# Altium PCB Phaser.PcbDoc (part 13 of 16)
Units mm, origin at the board's own origin, x right, y up, seen from the top; angles counter-clockwise.
Board outline 161.99 x 100 mm, 6 copper layers (TopLayer, MidLayer1, MidLayer2, SignalLayer1, Internal Plane 1, BottomLayer), stack 1.528 mm thick; 1017 components, 665 nets, 3453 pads, 2223 vias.
Unrouted connection lines stored in the file: 1.
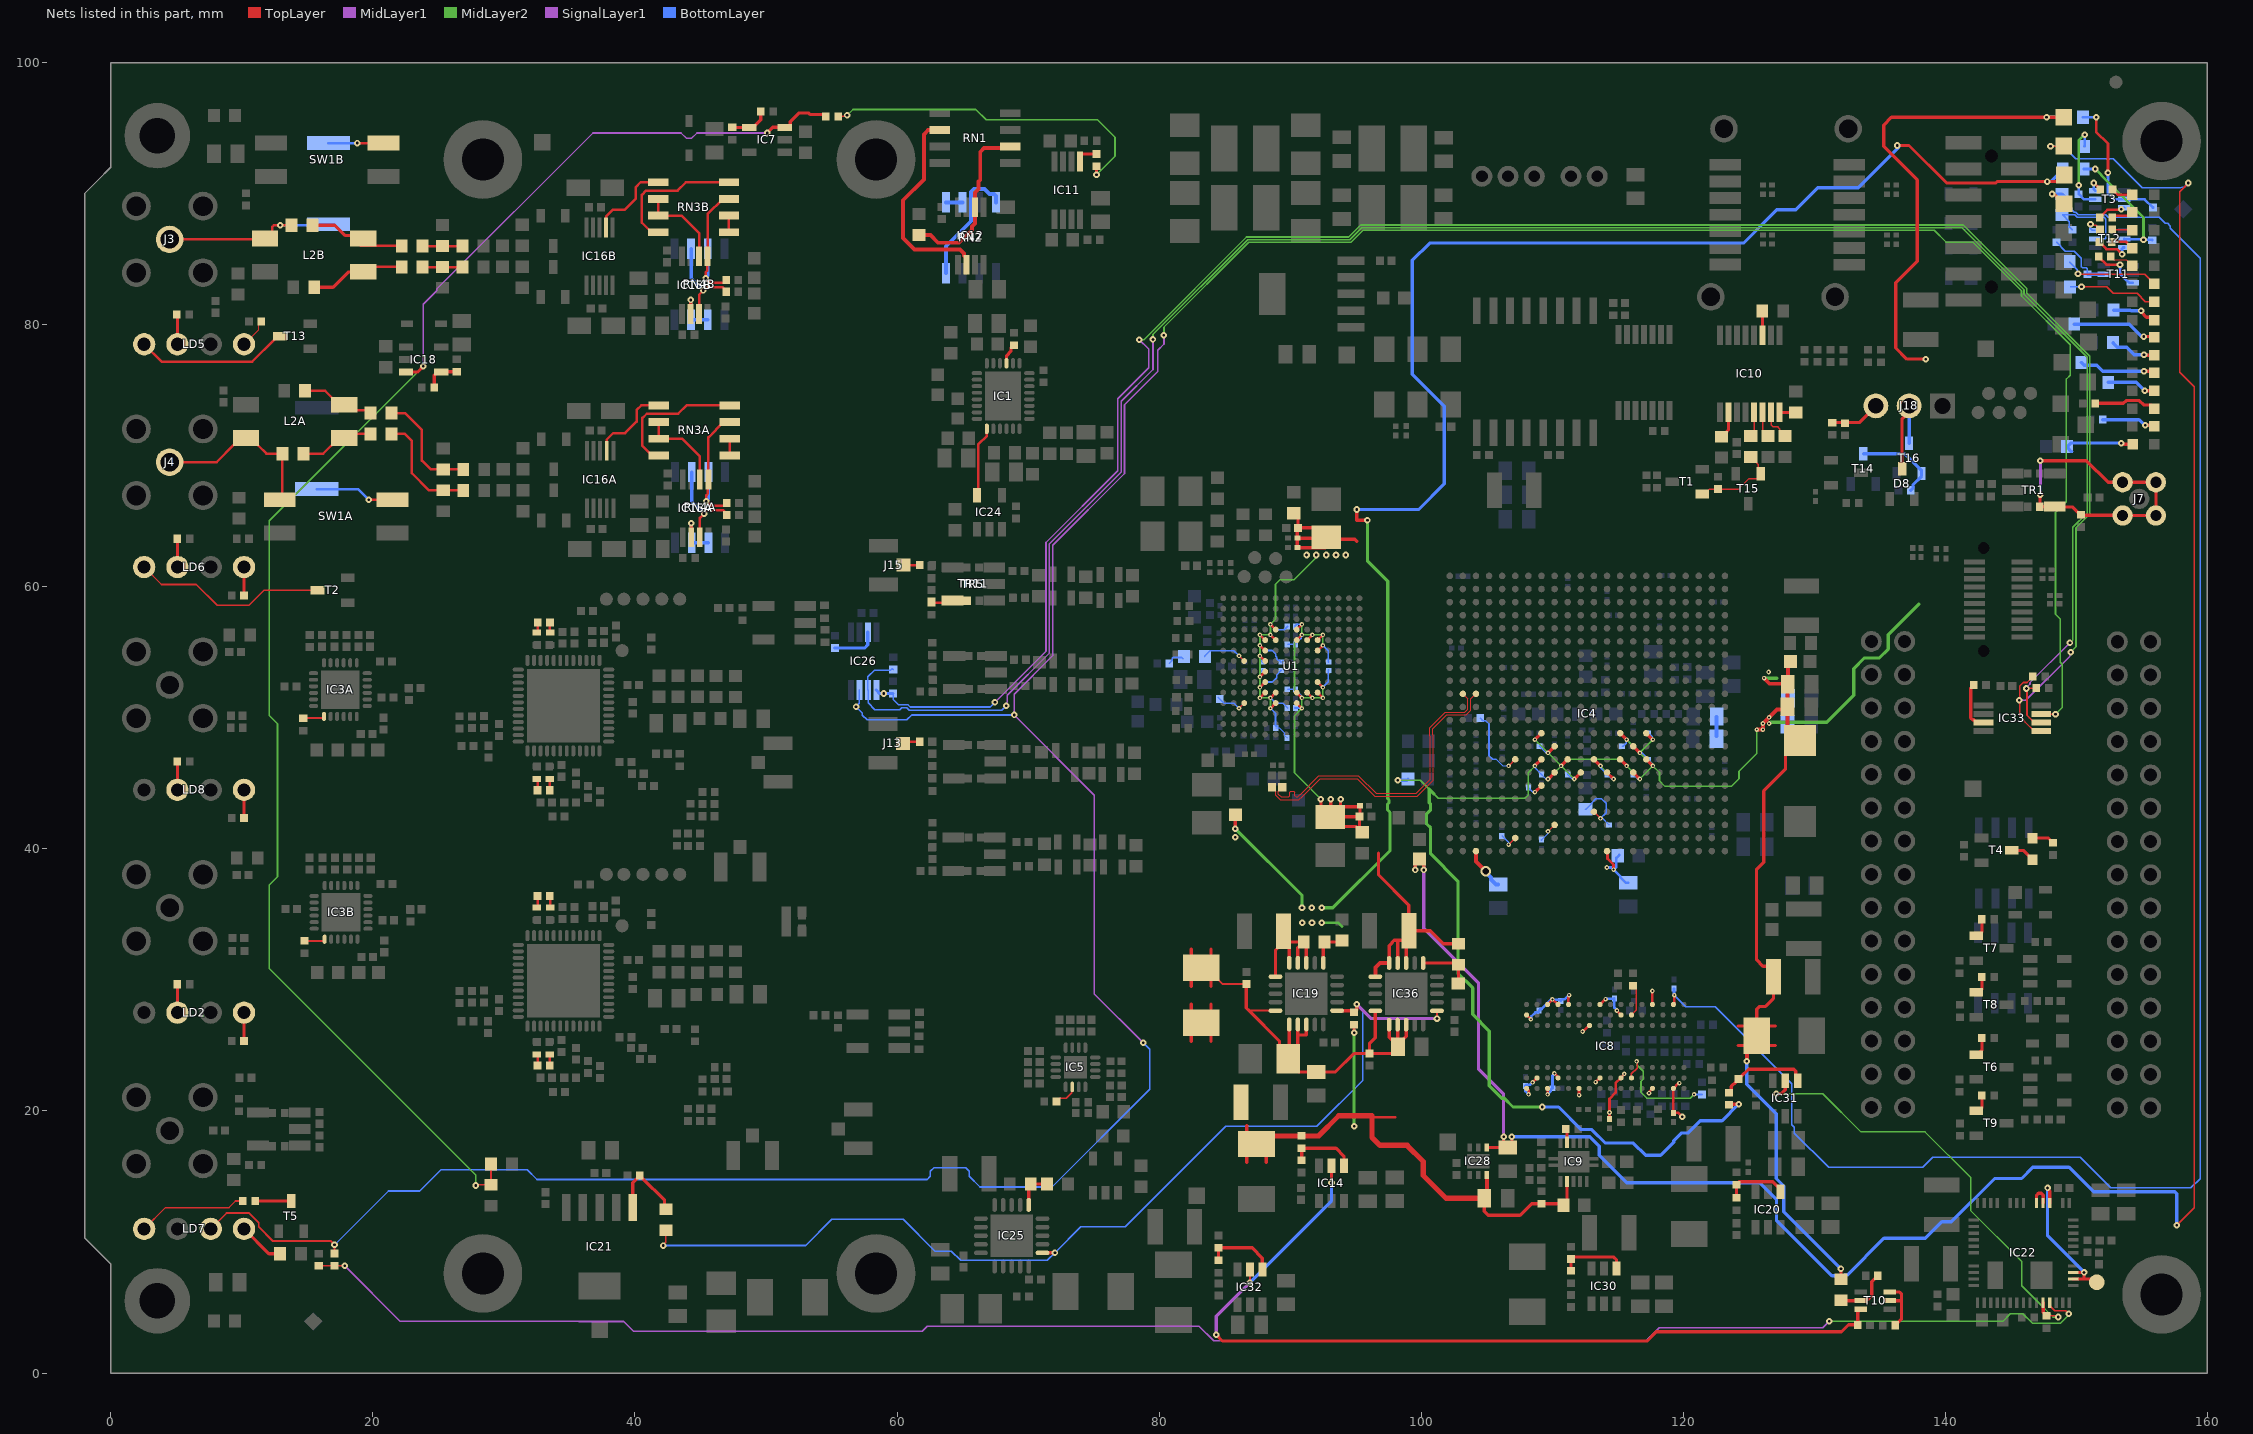
[diagram p15: the nets of this part, all layers, seen from the top]

## Via types
v1: diameter 0.5, hole 0.2, TopLayer to BottomLayer, tented both sides, 1374 vias
v2: diameter 0.35, hole 0.15, TopLayer to BottomLayer, tented both sides, 728 vias
v3: diameter 0.5, hole 0.2, TopLayer to BottomLayer, tented top, 96 vias
v4: diameter 0.6, hole 0.3, TopLayer to BottomLayer, 18 vias
v5: diameter 0.5, hole 0.2, TopLayer to BottomLayer, 5 vias
v6: diameter 0.35, hole 0.15, TopLayer to BottomLayer, 1 vias
v7: diameter 0.8, hole 0.5, TopLayer to BottomLayer, tented both sides, 1 vias

## Nets (pads, with @x,y where several pads share a name; then routed paths per layer and width w, separated by ;. In a path a pad name is that pad's centre, name@x,y a point inside that pad or via, vN(x,y) a via of type N, cw(c..) or ccw(c..) an arc to the next point about the centre after c; other vN are vias at no path point) (continued)
NetC389_1: C389.1 R85.1 R230.2 R254.2 TR5.4 TR11.4 | length 2.8
  TopLayer w0.19: R254.2@62.633,58.788 64.104,58.788 TR5.4@64.244,58.928 R85.1@65.338,58.928
NetD8_3: D8.3 J18.2 T16.3 | length 7.9
  TopLayer w0.25: D8.3@136.685,68.993 136.685,72.811 137.228,73.354 J18.2@137.228,73.8
  BottomLayer w0.25: T16.3@137.228,70.943 J18.2@137.228,73.8
NetIC1_9: IC1.9 IC24.5 | length 5.4
  TopLayer w0.19: IC24.5@66.1,66.975 66.214,67.089 66.214,70.88 66.85,71.516 IC1.9@66.85,72.05
NetIC1_25: IC1.25 R1.1 | length 1.6
  TopLayer w0.25: IC1.25@68.35,77.05 68.36,77.06 68.36,77.62 68.69,77.95 68.69,78.195 68.74,78.245 68.74,78.265 68.905,78.43 R1.1@68.925,78.43
NetIC3A_19: IC3A.19 R170.2 | length 1.7
  TopLayer w0.152: R170.2@14.735,49.981 16.273,49.981 16.275,49.983 IC3A.19@16.275,50.1
NetIC3B_19: IC3B.19 R147.2 | length 1.7
  TopLayer w0.152: R147.2@14.785,32.985 16.323,32.985 16.325,32.987 IC3B.19@16.325,33.104
NetIC4_F8: IC4.F8 R191.2 | length 5.8
  TopLayer w0.125: v2(106.675,46.325) IC4.F8@107.175,46.825
  BottomLayer w0.075: 105.727,46.819 106.221,46.325 v2(106.675,46.325)
  BottomLayer w0.125: R191.2@104.505,49.977 104.7,49.781 104.909,49.781 105.166,49.525 105.166,47.112 105.452,46.825 105.733,46.825
NetIC5_2: IC5.2 R165.2 | length 1.9
  TopLayer w0.125: R165.2@72.168,20.71 72.168,20.73 72.395,20.957 72.415,20.957 72.419,20.961 72.911,20.961 73.337,21.387 73.337,21.804 IC5.2@73.368,21.835
NetIC7_3: IC7.3 IC18.3 R60.1 R87.1 R130.1 | length 120.9
  TopLayer w0.125: v1(27.844,14.309) 27.9,14.366 R87.1@29.017,14.366 R130.1@29.017,15.96
  TopLayer w0.25: IC18.3@22.534,76.383 23.434,76.383 v1(23.859,76.808) ; v1(50.1,94.625) 50.525,95.05 IC7.3@51.425,95.05 51.7,95.05 51.85,95.2 51.85,95.475 52.525,96.15 53.242,96.15 53.355,96.037 54.407,96.037 54.559,95.885 R60.1@54.559,95.86
  MidLayer2 w0.125: v1(23.859,76.808) 12.09,65.04 12.09,50.179 12.729,49.54 12.729,37.88 12.09,37.242 12.09,30.867 27.844,15.114 v1(27.844,14.309)
  SignalLayer1 w0.125: v1(23.859,76.808) 23.859,81.56 24.888,82.588 24.888,82.713 36.8,94.625 43.521,94.625 43.933,94.213 44.317,94.213 44.729,94.625 v1(50.1,94.625)
NetIC7_4: IC7.4 R20.1 R23.2 | length 3.1
  TopLayer w0.25: R20.1@47.425,95.045 48.72,95.045 IC7.4@48.725,95.05 49.025,95.05 49.605,95.63 R23.2@49.605,96.275
NetIC8_L2: IC8.L2 R124.2 | length 9
  TopLayer w0.1: IC8.L2@116.041,22.52 116.041,22.841 116.465,23.265 v2@116.465,23.778
  MidLayer2 w0.125: v2@116.441,23.767 116.441,23.527 116.95,23.018 116.95,22.435 116.769,22.254 116.769,21.425 117.219,20.975 120.538,20.975 v2(120.825,21.262)
  BottomLayer w0.125: v2(120.825,21.262) 120.834,21.254 R124.2@121.42,21.254
  other v2: 116.43,23.778
NetIC8_L8: IC8.L8 R125.2 | length 2.4
  TopLayer w0.125: IC8.L8@116.041,27.32 116.392,27.671 116.392,29.544 R125.2@116.379,29.558
NetIC9_9: IC9.9 R127.1 | length 1
  TopLayer w0.25: R127.1@111.033,18.612 111.128,18.517 IC9.9@111.128,17.612
NetIC10_3: IC10.3 R185.1 | length 1.9
  TopLayer w0.25: R185.1@126.025,81.05 126.045,81.03 IC10.3@126.045,79.2
NetIC10_10: IC10.10 R187.2 | length 2.1
  TopLayer w0.25: R187.2@122.92,71.45 122.97,71.45 123.295,71.775 123.295,71.825 123.445,71.975 IC10.10@123.445,73.3
NetIC10_13: IC10.13 R56.2 | length 1.9
  TopLayer w0.115: R56.2@125.145,71.5 125.395,71.75 IC10.13@125.395,73.3
NetIC10_14: IC10.14 R186.1 | length 2
  TopLayer w0.115: IC10.14@126.045,73.3 126.045,71.9 126.07,71.875 126.07,71.825 126.395,71.5 R186.1@126.445,71.5
NetIC10_15: IC10.15 R188.1 | length 2.5
  TopLayer w0.115: IC10.15@126.695,73.3 126.704,73.291 126.704,72.346 126.85,72.2 127.199,72.2 127.345,72.054 127.345,71.9 127.37,71.875 127.37,71.825 127.695,71.5 R188.1@127.745,71.5
NetIC10_16: IC10.16 R189.1 | length 1.2
  TopLayer w0.25: IC10.16@127.345,73.3 R189.1@128.579,73.3
NetIC11_1: IC11.1 R90.1 | length 1.8
  TopLayer w0.25: IC11.1@73.97,92.45 73.97,93.02 R90.1@75.22,93.02
NetIC12_2: IC12.2 RN1.6 | length 16.4
  TopLayer w0.3: RN1.6@63.25,94.86 62.924,94.86 63.065,95.002 62.812,95.002 62.644,94.833 62.369,94.833 62.05,94.514 62.05,91.088 60.448,89.486 60.448,86.596 61.323,85.721 64.813,85.721 65.124,85.411 65.124,85.273 65.31,85.087 IC12.2@65.31,84.562
NetIC12_6: IC12.6 R7.1 RN1.2 | length 13.3
  TopLayer w0.3: R7.1@61.678,86.837 62.542,86.837 63.135,86.244 64.749,86.244 65.72,87.215 65.72,87.488 65.96,87.728 IC12.6@65.96,88.962 65.96,90.085 66.225,90.35 66.225,90.917 66.35,91.042 66.35,93.17 66.64,93.46 RN1.2@68.615,93.46
NetIC14_4: IC14.4 R133.1 R135.1 | length 5.1
  TopLayer w0.25: R135.1@90.875,16.245 R133.1@90.875,17.155 93.5,17.155 94.1,16.555 IC14.4@94.1,15.825
NetIC14_5: IC14.5 IC32.5 R154.1 T10.3 | length 68.5
  TopLayer w0.152: v1(86.925,6.9) IC32.5@86.925,7.9
  TopLayer w0.25: v1(84.35,2.925) 84.831,2.444 117.235,2.444 117.933,3.141 132.066,3.141 132.6,3.675 R154.1@133.305,3.675 133.305,4.63 T10.3@133.55,4.875 ; v1(93.15,14.525) IC14.5@93.15,15.825
  SignalLayer1 w0.25: v1(84.35,2.925) 84.35,4.325 v1(86.925,6.9)
  BottomLayer w0.25: v1(86.925,6.9) 93.15,13.125 v1(93.15,14.525)
NetIC15A_1: IC15A.1 R97A.1 RN3A.7 RN4A.7 | length 11.2
  TopLayer w0.19: R97A.1@47.005,66.38 46.808,66.183 45.792,66.183 v1(45.45,66.525) 45.45,66.97 45.575,67.095 45.575,68.055 45.525,68.105 IC15A.1@45.6,68.18 45.6,71.4 46.765,72.565 RN3A.7@47.225,72.565
  BottomLayer w0.25: v1(45.45,66.525) 45.61,66.685 RN4A.7@45.61,68.755
NetIC15A_2: IC15A.2 RN3A.2 RN3A.3 | length 6.7
  TopLayer w0.19: RN3A.2@41.825,72.565 RN3A.3@41.825,71.295 43.605,71.295 44.95,69.95 IC15A.2@44.95,68.18
NetIC15A_6: IC15A.6 RN4A.2 RN4A.3 | length 3.9
  TopLayer w0.25: IC15A.6@44.3,63.78 v1(44.3,64.855)
  BottomLayer w0.25: v1(44.3,64.855) 44.3,63.395 RN4A.3@44.34,63.355 RN4A.2@45.61,63.355
NetIC15A_7: IC15A.7 R58A.1 RN4A.6 | length 7.5
  TopLayer w0.19: IC15A.7@44.95,63.78 44.95,65.255 v1(45.275,65.58) 45.536,65.84 46.72,65.84 R58A.1@47.005,65.555
  BottomLayer w0.25: RN4A.6@44.34,68.755 44.34,66.515 v1(45.275,65.58)
NetIC15B_1: IC15B.1 R97B.1 RN3B.7 RN4B.7 | length 11.2
  TopLayer w0.19: R97B.1@46.955,83.405 46.758,83.208 45.742,83.208 v1(45.4,83.55) 45.4,83.995 45.525,84.12 45.525,85.08 45.475,85.13 IC15B.1@45.55,85.205 45.55,88.425 46.715,89.59 RN3B.7@47.175,89.59
  BottomLayer w0.25: v1(45.4,83.55) 45.56,83.71 RN4B.7@45.56,85.78
NetIC15B_2: IC15B.2 RN3B.2 RN3B.3 | length 6.7
  TopLayer w0.19: RN3B.2@41.775,89.59 RN3B.3@41.775,88.32 43.555,88.32 44.9,86.975 IC15B.2@44.9,85.205
NetIC15B_6: IC15B.6 RN4B.2 RN4B.3 | length 3.9
  TopLayer w0.25: IC15B.6@44.25,80.805 v1(44.25,81.88)
  BottomLayer w0.25: v1(44.25,81.88) 44.25,80.42 RN4B.3@44.29,80.38 RN4B.2@45.56,80.38
NetIC15B_7: IC15B.7 R58B.1 RN4B.6 | length 7.5
  TopLayer w0.19: IC15B.7@44.9,80.805 44.9,82.28 v1(45.225,82.605) 45.486,82.866 46.67,82.866 R58B.1@46.955,82.58
  BottomLayer w0.25: RN4B.6@44.29,85.78 44.29,83.54 v1(45.225,82.605)
NetIC16A_7: IC16A.7 RN3A.1 | length 6.4
  TopLayer w0.19: IC16A.7@37.85,70.38 37.85,71.23 38.345,71.725 39.25,71.725 40.125,72.6 40.125,73.475 40.485,73.835 RN3A.1@41.825,73.835
NetIC16B_7: IC16B.7 RN3B.1 | length 6.4
  TopLayer w0.19: IC16B.7@37.8,87.405 37.8,88.255 38.295,88.75 39.2,88.75 40.075,89.625 40.075,90.5 40.435,90.86 RN3B.1@41.775,90.86
NetIC18_4: IC18.4 R53.1 R80.2 | length 2.8
  TopLayer w0.25: R80.2@24.679,75.208 24.679,76.128 24.934,76.383 IC18.4@25.234,76.383 25.264,76.413 R53.1@26.409,76.413
NetIC19_11: IC19.11 IC25.11 IC36.11 R173.2 R240.2 | length 78.6
  TopLayer w0.125: v1(42.164,9.728) 42.164,9.793 42.36,9.989 R240.2@42.36,10.897 ; v1(101.2,27.049) IC36.11@101.2,27.639
  TopLayer w0.25: IC25.11@71.1,9.175 v1(72.05,9.175) ; IC19.11@93.579,27.647 94.748,27.647 R173.2@94.877,27.519 94.897,27.519 95.062,27.684 95.062,27.704 95.083,27.725 v1(95.083,28.142)
  SignalLayer1 w0.25: v1(95.083,28.142) 96.176,27.049 v1(101.2,27.049)
  BottomLayer w0.125: v1(42.164,9.728) 53.029,9.728 55.026,11.725 60.475,11.725 62.9,9.3 64.146,9.3 64.851,8.596 71.471,8.596 v1(72.05,9.175) 74.027,11.152 77.404,11.152 85.072,18.82 92.029,18.82 95.525,22.315 95.525,27.699 v1(95.083,28.142)
NetIC19_16: IC19.16 R180.1 R181.2 | length 3
  TopLayer w0.25: IC19.16@92.529,31.297 92.529,32.797 R180.1@92.629,32.897 R181.2@93.961,32.897
NetIC20_4: IC20.4 R166.1 R197.1 | length 4.9
  TopLayer w0.25: R197.1@124.05,13.365 R166.1@124.05,14.375 124.264,14.589 126.839,14.589 127.4,14.028 IC20.4@127.4,13.825
NetIC21_1: IC21.1 R132.2 R240.1 | length 6
  TopLayer w0.25: IC21.1@39.84,12.639 39.84,14.529 40.189,14.878 40.209,14.878 R132.2@40.374,15.043 ; R132.2@40.374,15.063 R132.2@40.374,15.043 ; R240.1@42.36,12.497 42.262,12.596 42.262,13.176 40.559,14.878 40.539,14.878 R132.2@40.374,15.043
NetIC22_4: IC22.4 IC22.43 IC22.44 TP2.1 | length 12.1
  TopLayer w0.254: v1(147.789,14.121) 147.789,14.055 147.95,13.894 IC22.4@147.95,12.975 ; IC22.43@149.75,7.175 150.525,7.175 ; IC22.44@149.75,7.675 v1(150.575,7.675) 150.575,7.225 150.525,7.175 ; TP2.1@151.55,6.925 151.3,7.175 150.525,7.175
  BottomLayer w0.254: v1(147.789,14.121) 147.789,10.461 v1(150.575,7.675)
NetIC22_5: IC22.5 IC22.6 | length 1.8
  TopLayer w0.254: IC22.6@146.95,12.975 146.95,13.576 147.099,13.725 147.301,13.725 147.45,13.576 IC22.5@147.45,12.975
NetIC22_37: IC22.37 IC31.5 R172.1 | length 34.6
  TopLayer w0.125: R172.1@147.7,4.37 148.505,4.37 v1(148.6,4.275)
  TopLayer w0.25: v1(127.1,21.32) 127.47,21.32 127.775,21.625 IC31.5@127.775,22.3
  TopLayer w0.254: IC22.37@147.45,5.375 147.45,4.62 R172.1@147.7,4.37
  MidLayer2 w0.125: v1(127.1,21.32) 130.627,21.32 133.549,18.398 138.444,18.398 141.928,14.914 ; 141.916,14.903 141.916,12.407 145.816,8.506 145.816,6.667 147.011,5.472 148.209,4.275 v1(148.6,4.275)
NetIC22_38: IC22.38 R169.2 R174.2 | length 139.7
  TopLayer w0.125: R169.2@15.875,8.175 15.88,8.18 R174.2@17.075,8.18 v1(17.85,8.18) ; IC22.38@147.95,5.375 147.95,5.136 148.335,4.751 149.174,4.751 v1(149.4,4.525)
  MidLayer2 w0.125: v1(131.14,3.962) 144.383,3.962 144.933,4.513 144.938,4.513 144.95,4.525 145.905,4.525 146.618,3.812 148.792,3.812 149.4,4.421 v1(149.4,4.525)
  SignalLayer1 w0.125: v1(17.85,8.18) 22.067,3.963 35.692,3.963 35.717,3.938 39.142,3.938 39.892,3.187 61.917,3.187 62.303,3.573 83.047,3.573 84.158,2.462 117.163,2.462 118.15,3.45 130.628,3.45 v1(131.14,3.962)
NetIC25_16: IC25.16 R167.1 R168.2 | length 2.9
  TopLayer w0.25: IC25.16@70.05,12.825 70.05,14.275 R167.1@70.2,14.425 R168.2@71.45,14.425
NetIC26_1: IC26.1 IC33.1 R171.1 R179.2 | length 157.9
  TopLayer w0.125: R179.2@146.672,53.162 146.672,53.142 146.226,52.696 145.935,52.696 145.664,52.425 145.664,51.325 145.664,50.087 146.488,49.263 146.502,49.263 146.819,48.946 IC33.1@147.269,48.946
  MidLayer2 w0.125: v1(78.485,78.855) 78.84,78.855 86.667,86.682 94.469,86.682 95.384,87.596 134.627,87.596 134.629,87.598 141.35,87.598 146.199,82.749 146.199,82.409 151.019,77.589 151.019,65.548 149.962,64.491 149.962,55.415 v1(149.546,54.999)
  SignalLayer1 w0.125: v1(67.473,51.175) 71.365,55.067 71.365,63.38 76.841,68.856 76.841,74.351 79.2,76.711 79.2,78.14 v1(78.485,78.855) ; v1(145.626,51.325) 146.121,51.325 149.474,54.678 149.474,54.927 v1(149.546,54.999)
  BottomLayer w0.127: R171.1@59.698,51.849 59.698,51.401 60.118,50.982 60.833,50.982 60.996,50.819 67.117,50.819 v1(67.473,51.175)
  BottomLayer w0.25: IC26.1@58.423,52.119 58.693,51.849 R171.1@59.698,51.849
  other v1: 58.987,51.851
NetIC26_2: IC26.2 IC33.2 R162.1 R175.2 | length 158.1
  TopLayer w0.125: v1(146.18,52.233) 146.193,52.246 R175.2@146.672,52.246 ; v1@146.226,52.246 146.226,50.189 146.399,50.016 146.399,50.002 146.488,49.913 146.502,49.913 146.809,49.606 IC33.2@146.863,49.606 ; R175.2@146.672,52.261 R175.2@146.934,52.261
  MidLayer2 w0.125: v1(79.527,78.867) 79.527,79.258 86.75,86.481 94.552,86.481 95.467,87.395 134.71,87.395 134.712,87.397 141.266,87.397 145.998,82.666 145.998,82.325 150.818,77.505 150.818,65.631 149.715,64.528 149.715,55.935 149.511,55.731 v1(149.499,55.731)
  SignalLayer1 w0.125: v1(68.346,50.918) 68.418,50.989 68.418,51.726 71.629,54.937 71.629,63.271 77.104,68.747 77.104,74.152 79.527,76.575 v1(79.527,78.867) ; v1(146.18,52.233) 146.18,52.308 146.452,52.58 146.452,52.684 v1(149.499,55.731)
  BottomLayer w0.127: R162.1@59.715,53.683 59.677,53.721 59.601,53.721 59.504,53.624 58.278,53.624 57.773,53.119 IC26.2@57.773,52.119 57.792,52.101 57.792,51.14 58.31,50.622 60.216,50.622 60.36,50.766 60.744,50.766 60.941,50.569 67.997,50.569 v1(68.346,50.918)
NetIC26_3: IC26.3 IC33.3 LD7.3 R174.1 | length 268.7
  TopLayer w0.127: LD7.3@7.63,11 8.83,12.2 ; R174.1@17.075,9.12 v1(17.075,9.775) ; IC33.3@147.3,50.29 147.323,50.267 v1(148.398,50.267)
  TopLayer w0.152: 8.83,12.2 10.562,12.2 11.296,11.466 11.296,11.154 12.375,10.075 16.775,10.075 v1(17.075,9.775)
  MidLayer2 w0.125: v1(80.366,79.178) 80.366,79.811 86.834,86.279 94.636,86.279 95.55,87.194 135.081,87.194 135.083,87.196 139.142,87.196 140.042,86.296 142.083,86.296 145.797,82.582 145.797,82.186 149.511,78.472 149.511,76.132 149.23,75.851 149.23,66.493 148.398,65.661 148.398,57.892 148.76,57.53 148.76,54.24 148.921,54.079 148.921,50.79 v1(148.398,50.267)
  SignalLayer1 w0.125: 71.882,54.746 71.882,63.166 77.358,68.642 77.358,73.895 79.888,76.426 79.888,78.043 80.366,78.521 v1(80.366,79.178)
  SignalLayer1 w0.127: 71.882,54.746 68.939,51.803 v1(68.939,50.213) 75.061,44.092 75.061,28.927 v1(78.791,25.197)
  BottomLayer w0.127: v1(17.075,9.775) 21.193,13.893 23.581,13.893 25.196,15.508 31.786,15.508 32.521,14.773 62.294,14.773 62.544,15.022 62.544,15.392 62.815,15.663 65.235,15.663 65.506,15.392 65.506,15.022 66.328,14.2 71.826,14.2 79.275,21.65 79.275,24.713 v1(78.791,25.197) ; IC26.3@57.123,52.119 57.123,51.1 v1(56.871,50.848) 57.356,50.362 57.356,50.202 57.72,49.839 60.744,49.839 61.119,50.213 v1(68.939,50.213)
NetIC26_7: IC26.7 R178.2 | length 3.6
  BottomLayer w0.25: R178.2@55.253,55.324 57.53,55.324 57.773,55.567 IC26.7@57.773,56.519
NetIC30_4: IC30.4 R198.1 R199.1 | length 5.2
  TopLayer w0.25: R199.1@111.425,7.795 R198.1@111.425,8.705 111.57,8.85 114.7,8.85 114.9,8.65 IC30.4@114.9,7.975
NetIC31_4: IC31.4 R131.2 R241.1 | length 7
  TopLayer w0.25: R131.2@123.396,21.488 R131.2@123.486,21.398 123.647,21.559 123.647,21.867 124.02,22.24 124.04,22.24 124.205,22.405 R241.1@124.205,22.425 124.205,22.445 124.37,22.61 124.39,22.61 124.97,23.19 128.422,23.19 128.568,23.043 128.568,22.457 IC31.4@128.725,22.3
NetIC32_4: IC32.4 R200.1 R201.1 | length 5.5
  TopLayer w0.25: R200.1@84.525,8.595 R201.1@84.525,9.555 87.095,9.555 87.875,8.775 IC32.4@87.875,7.9
NetIC33_7: IC33.7 R176.2 | length 3.7
  TopLayer w0.25: R176.2@142.155,52.5 142.155,52.48 141.936,52.262 141.936,49.976 142.062,49.851 142.164,49.851 142.375,49.64 IC33.7@142.9,49.64
NetIC36_16: IC36.16 R255.1 R256.2 | length 4.2
  TopLayer w0.25: IC36.16@100.15,31.289 102.719,31.289 R255.1@102.85,31.158 102.85,29.757 R256.2@102.825,29.732
NetJ3_1: J3.1 L2B.1 R8B.1 R83B.2 | length 13.9
  TopLayer w0.19: J3.1@4.307,86.5 J3.1@4.5,86.5 11.7,86.5 L2B.1@11.775,86.575 11.839,86.575 12.344,87.08 12.344,87.469 12.455,87.58 v1(12.925,87.58) R8B.1@13.8,87.58
  BottomLayer w0.19: v1(12.925,87.58) 16.539,87.58 R83B.2@16.612,87.653
NetJ4_1: J4.1 L2A.2 R98A.1 SW1A.1 | length 13.7
  TopLayer w0.19: J4.1@4.307,69.5 J4.1@4.5,69.5 8.082,69.5 9.421,70.839 9.421,70.85 9.926,71.355 L2A.2@10.326,71.355 10.726,71.355 11.231,70.85 11.231,70.795 11.876,70.15 R98A.1@13.104,70.15 13.104,66.836 SW1A.1@12.898,66.63
NetJ7_2: J7.2 R27.2 R45.1 TR1.6 | length 25.7
  TopLayer w0.25: R45.1@147.193,66.091 147.437,66.091 148.323,66.091 149.682,66.091 150.395,65.378 150.479,65.462 153.486,65.462 J7.2@153.518,65.43 J7.2@156.058,65.43 J7.2@156.058,67.97 J7.2@153.518,67.97 153.515,67.968 152.412,67.968 150.759,69.621 v1(147.244,69.621) ; R45.1@147.207,66.105 147.437,66.105 148.323,66.105 TR1.6@148.328,66.11 ; v1(147.218,67.031) 147.218,66.319 R45.1@147.244,66.294
  MidLayer1 w0.25: v1(147.218,67.031) 147.244,67.056 v1(147.244,69.621)
NetJ13_1: J13.1 R246.1 | length 1.4
  TopLayer w0.19: J13.1@60.329,48.172 R246.1@61.734,48.172
NetJ15_1: J15.1 R247.1 | length 1.2
  TopLayer w0.19: J15.1@60.5,61.646 R247.1@61.744,61.646
NetJ18_3: J18.3 R276.2 R277.2 | length 3.9
  TopLayer w0.25: R277.2@131.359,72.524 133.411,72.524 J18.3@134.688,73.8
NetL2A_3: L2A.3 R25A.1 R98A.2 | length 5.6
  TopLayer w0.19: R98A.2@14.704,70.15 16.221,70.15 17.338,71.267 L2A.3@17.738,71.267 ; L2A.3@17.826,71.355 18.125,71.653 R25A.1@19.83,71.653
NetL2A_4: L2A.4 R8A.2 R9A.1 | length 5.7
  TopLayer w0.19: R8A.2@14.836,74.95 16.352,74.95 17.407,73.895 L2A.4@17.826,73.895 18.245,73.475 19.609,73.475 R9A.1@19.83,73.253
NetL2B_3: L2B.3 R25B.1 R98B.2 | length 6.6
  TopLayer w0.19: L2B.3@19.275,83.885 19.795,84.405 R25B.1@22.2,84.405
  TopLayer w0.25: R98B.2@15.525,82.85 16.965,82.85 18.125,84.01 L2B.3@18.525,84.01
NetL2B_4: L2B.4 R8B.2 R9B.1 | length 8.1
  TopLayer w0.19: L2B.4@19.275,86.575 19.07,86.37 19.07,86.005 R9B.1@22.2,86.005
  TopLayer w0.25: R8B.2@15.4,87.58 17.095,87.58 17.87,86.805 19.045,86.805 L2B.4@19.275,86.575
NetL29A_2: L29A.2 R38A.2 | length 0.8
  TopLayer w0.19: L29A.2@33.496,24.315 33.496,23.487 R38A.2@33.508,23.474
NetL29B_2: L29B.2 R38B.2 | length 0.9
  TopLayer w0.19: L29B.2@33.506,45.327 33.506,44.468 R38B.2@33.508,44.466
NetL31A_2: L31A.2 R38A.1 | length 0.8
  TopLayer w0.19: R38A.1@32.568,23.474 32.571,23.476 L31A.2@32.571,24.315
NetL31B_2: L31B.2 R38B.1 | length 0.9
  TopLayer w0.19: R38B.1@32.568,44.466 32.581,44.479 L31B.2@32.581,45.327
NetL33A_2: L33A.2 R41A.2 | length 0.9
  TopLayer w0.19: R41A.2@33.508,36.404 33.525,36.387 L33A.2@33.525,35.529
NetL33B_2: L33B.2 R41B.2 | length 0.7
  TopLayer w0.19: L33B.2@33.516,56.52 R41B.2@33.516,57.255
NetL38A_2: L38A.2 R41A.1 | length 0.9
  TopLayer w0.19: R41A.1@32.568,36.404 32.6,36.372 L38A.2@32.6,35.529
NetL38B_2: L38B.2 R41B.1 | length 0.7
  TopLayer w0.19: R41B.1@32.576,57.255 32.591,57.24 L38B.2@32.591,56.52
NetLD1_1: LD1.1 R202.1 | length 1.7
  TopLayer w0.2: R202.1@152.718,88.163 152.853,88.299 154.011,88.299 LD1.1@154.267,88.556
NetLD2_2: LD2.2 R153.2 | length 2.2
  TopLayer w0.25: LD2.2@5.09,27.5 R153.2@5.09,29.662
NetLD2_4: LD2.4 R26.2 | length 2.2
  TopLayer w0.25: R26.2@10.17,25.338 LD2.4@10.17,27.5
NetLD3_1: LD3.1 T4.3 | length 1.9
  TopLayer w0.25: T4.3@145.05,39.875 145.942,39.875 LD3.1@146.642,39.175
NetLD3_2: LD3.2 R92.1 | length 1.7
  TopLayer w0.25: LD3.2@146.642,40.825 147.845,40.825 R92.1@148.2,40.47
NetLD4_2: LD4.2 R213.1 | length 3.5
  TopLayer w0.25: v1(154.924,81.047) 154.924,80.98 155.332,80.572 155.686,80.572 LD4.2@155.917,80.34
  BottomLayer w0.25: R213.1@152.819,81.102 154.119,81.102 154.174,81.047 v1(154.924,81.047)
NetLD5_1: LD5.1 T13.3 | length 11.7
  TopLayer w0.19: LD5.1@2.55,78.5 3.875,77.175 10.801,77.175 12.495,78.869 12.495,78.872 12.725,79.102 T13.3@12.925,79.102
NetLD5_2: LD5.2 R64.2 | length 2.2
  TopLayer w0.25: LD5.2@5.09,78.5 R64.2@5.09,80.662
NetLD5_4: LD5.4 R28.2 | length 2.3
  TopLayer w0.095: LD5.4@10.17,78.5 11.278,79.607 11.278,80.024 R28.2@11.495,80.241
NetLD6_1: LD6.1 T2.3 | length 14.9
  TopLayer w0.127: LD6.1@2.55,61.5 3.877,60.173 6.534,60.173 8.13,58.577 10.555,58.577 11.721,59.743 T2.3@15.779,59.743
NetLD6_2: LD6.2 R260.2 | length 2.2
  TopLayer w0.25: LD6.2@5.09,61.5 R260.2@5.09,63.662
NetLD6_4: LD6.4 R30.2 | length 2.2
  TopLayer w0.25: R30.2@10.17,59.338 LD6.4@10.17,61.5
NetLD7_1: LD7.1 R44.2 | length 8.4
  TopLayer w0.125: LD7.1@2.55,11 4.175,12.625 9.025,12.625 9.525,13.125 R44.2@10.08,13.125
NetLD7_4: LD7.4 R143.1 | length 3.5
  TopLayer w0.25: LD7.4@10.17,11 12.07,9.1 R143.1@12.925,9.1
NetLD8_2: LD8.2 R152.2 | length 2.2
  TopLayer w0.25: LD8.2@5.09,44.5 R152.2@5.09,46.662
NetLD8_4: LD8.4 R234.2 | length 2.2
  TopLayer w0.25: R234.2@10.17,42.338 LD8.4@10.17,44.5
NetLD9_1: LD9.1 R204.1 | length 1.6
  TopLayer w0.127: R204.1@152.73,87.249 154.214,87.249 LD9.1@154.267,87.196
NetLD10_1: LD10.1 R33.1 | length 1.7
  TopLayer w0.19: R33.1@152.743,90.322 152.743,90.302 153.129,89.916 LD10.1@154.267,89.916
NetLD11_2: LD11.2 R218.1 | length 4.8
  TopLayer w0.25: R218.1@151.422,73.99 153.562,73.99 153.779,74.207 154.796,74.207 155.134,73.868 155.642,73.868 LD11.2@155.917,73.593
NetLD12_1: LD12.1 R207.1 | length 1.8
  TopLayer w0.2: R207.1@152.692,86.309 153.793,86.309 LD12.1@154.267,85.835
NetLD13_1: LD13.1 R221.1 | length 1.4
  TopLayer w0.095: R221.1@152.626,85.195 152.86,84.962 153.781,84.962 LD13.1@153.906,84.836
NetLD14_2: LD14.2 R211.1 | length 7.3
  TopLayer w0.1: v1(150.115,83.875) 150.155,83.836 155.197,83.836 LD14.2@155.917,83.115
  BottomLayer w0.1: R211.1@149.479,84.811 149.479,84.761 150.039,84.201 150.039,83.952 v1(150.115,83.875)
NetLD15_2: LD15.2 R212.1 | length 6.9
  TopLayer w0.1: v1(150.381,82.875) 152.316,82.875 152.794,82.398 154.621,82.398 155.264,81.755 LD15.2@155.917,81.755
  BottomLayer w0.1: R212.1@149.504,82.88 149.51,82.875 v1(150.381,82.875)
NetLD16_2: LD16.2 R214.1 | length 6.5
  TopLayer w0.254: v1(155.126,79.088) 155.848,79.088 LD16.2@155.917,79.019
  BottomLayer w0.254: R214.1@149.822,80.035 154.012,80.035 154.959,79.088 v1(155.126,79.088)
NetLD17_2: LD17.2 R215.1 | length 3.6
  TopLayer w0.254: v1(155.15,77.709) 155.185,77.674 LD17.2@155.917,77.674
  BottomLayer w0.254: R215.1@152.794,78.638 152.794,78.588 153.117,78.265 153.839,78.265 154.396,77.709 v1(155.15,77.709)
NetLD18_2: LD18.2 R216.1 | length 5.9
  TopLayer w0.254: v1(155.15,76.441) 155.79,76.441 LD18.2@155.917,76.314
  BottomLayer w0.254: R216.1@150.368,77.114 150.582,76.9 151.541,76.9 152.001,76.441 v1(155.15,76.441)
NetLD19_2: LD19.2 R217.1 | length 3.8
  TopLayer w0.254: v1(155.197,74.964) 155.207,74.953 LD19.2@155.917,74.953
  BottomLayer w0.254: R217.1@152.425,75.59 154.57,75.59 v1(155.197,74.964)
NetLD20_2: LD20.2 R219.1 | length 4.1
  TopLayer w0.25: v1(155.235,72.321) 155.829,72.321 LD20.2@155.917,72.233
  BottomLayer w0.25: R219.1@152.006,72.746 154.776,72.746 155.2,72.321 v1(155.235,72.321)
NetLD21_1: LD21.1 R220.1 | length 5.7
  TopLayer w0.25: v1(153.412,70.961) 153.501,70.873 LD21.1@154.291,70.873
  BottomLayer w0.25: R220.1@149.651,70.313 149.601,70.313 149.276,70.638 R220.1@149.276,70.688 149.549,70.961 v1(153.412,70.961)
NetR9A_2: R9A.2 R10A.1 R51A.2 | length 8.6
  TopLayer w0.19: R9A.2@21.43,73.253 22.469,73.253 23.75,71.972 23.75,69.63 24.425,68.955 R51A.2@25.375,68.955 R10A.1@26.9,68.955
NetR9B_2: R9B.2 R10B.1 R51B.2 | length 3
  TopLayer w0.19: R9B.2@23.8,85.98 25.325,85.98 R10B.1@26.85,85.98
NetR25A_2: R25A.2 R74A.1 R137A.2 | length 8.7
  TopLayer w0.19: R25A.2@21.43,71.653 22.441,71.653 22.975,71.12 22.975,68.657 24.277,67.355 R137A.2@25.375,67.355 R74A.1@26.9,67.355
NetR25B_2: R25B.2 R74B.1 R137B.2 | length 3
  TopLayer w0.19: R25B.2@23.8,84.38 25.325,84.38 R74B.1@26.85,84.38
NetR33_2: R33.2 T3.6 | length 1.3
  TopLayer w0.19: v1(151.32,90.805) 151.34,90.805 151.803,90.342 R33.2@151.803,90.322
  BottomLayer w0.19: v1(151.32,90.805) 151.32,90.315 151.425,90.21 T3.6@151.427,90.21
NetR34_1: R34.1 U1.H12 | length 3.5
  TopLayer w0.125: v2(86.093,54.725) U1.H12@86.493,54.325
  BottomLayer w0.125: R34.1@83.492,54.676 83.492,54.726 83.879,55.113 83.892,55.113 83.904,55.125 85.693,55.125 v2(86.093,54.725)
NetR34_2: R34.2 R35.1 | length 1.4
  BottomLayer w0.127: R35.1@80.785,54.153 81.011,54.379 81.011,54.552 81.06,54.6 81.721,54.6 R34.2@81.821,54.5
NetR44_1: R44.1 T5.3 | length 2.8
  TopLayer w0.25: R44.1@11.02,13.125 T5.3@13.775,13.125
NetR56_1: R56.1 R190.1 T1.1 T15.1 | length 6.8
  TopLayer w0.115: T1.1@121.445,67.075 121.645,67.075 121.845,67.275 121.845,67.309 121.991,67.455 R190.1@122.645,67.455 124.215,67.455 125.007,68.248 125.695,68.248 125.895,68.448 T15.1@125.895,68.625 125.717,68.803 125.717,69.328 125.52,69.525 125.52,69.575 125.195,69.9 R56.1@125.145,69.9
NetR60_2: R60.2 R90.2 | length 26.3
  TopLayer w0.125: R60.2@55.512,95.885 56.007,95.885 56.083,95.961 v1(56.185,95.961)
  TopLayer w0.25: v1(75.22,91.425) R90.2@75.22,92.08
  MidLayer2 w0.125: v1(56.185,95.961) 56.642,96.418 66.012,96.418 66.805,95.625 75.294,95.625 76.632,94.288 76.632,92.837 v1(75.22,91.425)
NetR63_2: R63.2 U1.D12 | length 2.5
  TopLayer w0.125: v2(86.093,50.725) U1.D12@86.493,51.125
  BottomLayer w0.125: R63.2@84.516,51.55 84.954,51.112 85.705,51.112 v2(86.093,50.725)
NetR70_1: R70.1 T6.1 | length 1.5
  TopLayer w0.25: T6.1@142.35,24.4 142.55,24.4 142.78,24.63 R70.1@142.78,25.575
NetR82_1: R82.1 T7.1 | length 1.5
  TopLayer w0.25: T7.1@142.35,33.45 142.55,33.45 142.78,33.68 R82.1@142.78,34.625
NetR83A_1: R83A.1 SW1A.4 | length 6.1
  TopLayer w0.19: v1(19.703,66.63) SW1A.4@21.498,66.63
  BottomLayer w0.19: R83A.1@15.725,67.455 18.878,67.455 v1(19.703,66.63)
NetR83B_1: R83B.1 SW1B.4 | length 4.2
  TopLayer w0.19: v1(18.821,93.853) 18.825,93.849 SW1B.4@20.825,93.849
  BottomLayer w0.19: R83B.1@16.612,93.853 v1(18.821,93.853)
NetR139_1: R139.1 T10.5 T10.6 | length 4.4
  TopLayer w0.25: T10.5@135.75,5.525 136.65,5.525 ; T10.6@135.75,6.175 136.5,6.175 136.65,6.025 136.65,5.525 ; R139.1@136.17,3.65 136.65,4.13 136.65,5.525
NetR140_1: R140.1 T9.1 | length 1.5
  TopLayer w0.25: T9.1@142.35,20 142.55,20 142.78,20.23 R140.1@142.78,21.175
NetR145_1: R145.1 T8.1 | length 1.5
  TopLayer w0.25: T8.1@142.35,29.05 142.55,29.05 142.78,29.28 R145.1@142.78,30.225
NetR155_1: R155.1 R164.2 T10.2 | length 4.2
  TopLayer w0.25: R155.1@132.025,5.55 132.05,5.525 T10.2@133.55,5.525 133.625,5.6 134.059,5.6 134.375,5.916 134.375,6.955 R164.2@134.845,7.425
NetR177_2: R177.2 R182.1 T3.2 | length 11.1
  TopLayer w0.2: v1(151.5,95.822) 151.5,94.71 152.4,93.81 v1(152.4,91.592)
  BottomLayer w0.2: R182.1@150.495,95.822 v1(151.5,95.822) ; v1(152.4,91.592) 152.4,90.012 152.852,89.56 155.199,89.56 155.825,88.935 R177.2@155.845,88.935
NetR183_1: R183.1 R203.2 T3.5 | length 7
  MidLayer2 w0.2: v1(150.165,90.642) 150.165,94.031 v1(150.622,94.488)
  BottomLayer w0.2: v1(150.165,90.642) R203.2@150.165,89.954 150.185,89.954 150.579,89.56 T3.5@151.427,89.56 ; R183.1@150.596,93.599 150.622,93.625 v1(150.622,94.488)
NetR202_2: R202.2 T3.3 | length 2.2
  TopLayer w0.19: R202.2@151.778,88.163 151.778,88.183 152.342,88.748 153.361,88.748 v1(153.412,88.799)
  BottomLayer w0.19: v1(153.412,88.799) 153.412,88.805 153.517,88.91 T3.3@153.627,88.91
NetR204_2: R204.2 T12.6 | length 1.7
  TopLayer w0.1: v1(151.066,87.661) 151.143,87.585 151.455,87.585 151.53,87.509 151.55,87.509 151.79,87.269 R204.2@151.79,87.249
  BottomLayer w0.1: v1(151.066,87.661) 151.066,87.338 151.216,87.188 T12.6@151.435,87.188
NetR205_1: R205.1 R206.2 T12.2 | length 10
  MidLayer2 w0.2: v1(151.435,91.875) 151.9,91.41 151.9,91.385 155.111,88.174 v1(155.111,86.479)
  BottomLayer w0.2: R205.1@150.546,91.872 150.549,91.875 v1(151.435,91.875) ; T12.2@153.635,86.538 153.664,86.508 155.081,86.508 v1(155.111,86.479) 155.126,86.464 155.763,86.464 R206.2@155.778,86.448
NetR207_2: R207.2 T12.3 | length 2.8
  TopLayer w0.2: R207.2@151.752,86.309 151.752,86.289 152.284,85.758 153.076,85.758 v1(153.475,85.359)
  BottomLayer w0.2: v1(153.475,85.359) 153.475,85.788 153.575,85.888 T12.3@153.635,85.888
NetR208_1: R208.1 R209.2 T12.5 | length 7.2
  BottomLayer w0.1: R208.1@148.895,88.367 R208.1@148.945,88.367 ; R209.2@149.708,87.236 149.688,87.236 149.448,87.476 149.448,87.864 R208.1@148.945,88.367 ; T12.5@151.435,86.538 152.181,86.538 152.24,86.596 152.24,88.052 152.114,88.178 150.066,88.178 149.877,88.367 R208.1@148.945,88.367
NetR210_1: R210.1 R222.2 T11.5 | length 5.3
  BottomLayer w0.1: R210.1@148.463,86.284 148.483,86.284 149.158,85.609 149.827,85.609 150.376,85.06 150.376,84.425 150.458,84.344 150.76,84.344 150.832,84.273 R222.2@150.832,83.839
  BottomLayer w0.25: R222.2@150.832,83.839 152.081,83.839 T11.5@152.087,83.845
NetR221_2: R221.2 T11.3 | length 3.9
  TopLayer w0.2: R221.2@151.686,85.195 151.686,85.175 152.287,84.575 v1(153.317,84.575)
  BottomLayer w0.2: v1(153.317,84.575) 153.317,83.873 153.734,83.457 153.751,83.457 154.012,83.195 T11.3@154.287,83.195
NetR278_1: R278.1 T14.3 T16.1 | length 6.8
  BottomLayer w0.25: T14.3@133.738,70.143 136.879,70.143 138.178,68.843 T16.1@138.178,68.643 138.178,68.443 137.524,67.79 137.524,67.527 R278.1@137.359,67.362
NetRN2_1: RN2.1 RN2.2 | length 1.3
  BottomLayer w0.3: RN2.1@63.73,89.33 RN2.2@65,89.33
NetRN2_4: RN2.4 RN2.8 | length 9.7
  BottomLayer w0.3: RN2.8@63.73,83.93 63.73,85.98 65.639,87.889 65.639,90.112 65.871,90.344 66.669,90.344 67.058,89.955 67.39,89.955 67.54,89.805 RN2.4@67.54,89.33
NetRN3A_4: RN3A.4 RN3A.8 | length 10.7
  TopLayer w0.19: RN3A.4@41.825,70.025 41.3,70.025 40.575,70.75 40.575,72.875 40.9,73.2 43.3,73.2 43.935,73.835 RN3A.8@47.225,73.835
NetRN3A_5: RN3A.5 RN3A.6 | length 1.3
  TopLayer w0.19: RN3A.5@47.225,70.025 RN3A.6@47.225,71.295
NetRN3B_4: RN3B.4 RN3B.8 | length 10.7
  TopLayer w0.19: RN3B.4@41.775,87.05 41.25,87.05 40.525,87.775 40.525,89.9 40.85,90.225 43.25,90.225 43.885,90.86 RN3B.8@47.175,90.86
NetRN3B_5: RN3B.5 RN3B.6 | length 1.3
  TopLayer w0.19: RN3B.5@47.175,87.05 RN3B.6@47.175,88.32
OSTR_N: C360.1 IC4.B13 | length 23.5
  TopLayer w0.095: C360.1@89.398,44.695 89.108,44.405 89.108,44.182 89.333,43.957 89.604,43.957 89.89,43.957 89.985,44.052 89.985,44.331 90.061,44.407 90.289,44.407 90.365,44.331 90.365,44.052 90.46,43.957 90.567,43.957 90.576,43.957 90.745,44.126 90.792,44.173 92.197,45.578 95.201,45.578 96.551,44.229 99.603,44.229 100.683,45.309 100.683,48.562 100.641,48.605 100.641,49.243 101.836,50.439 103.335,50.439 103.565,50.669 103.565,51.444 103.184,51.825 IC4.B13@103.175,51.825
OSTR_P: C363.1 IC4.C13 | length 23.5
  TopLayer w0.095: C363.1@88.598,44.695 88.888,44.405 88.888,44.091 89.242,43.737 90.667,43.737 90.948,44.018 92.288,45.358 95.11,45.358 96.46,44.009 99.694,44.009 100.903,45.218 100.903,48.654 100.861,48.696 100.861,49.152 101.928,50.219 103.426,50.219 103.785,50.577 103.785,51.435 IC4.C13@104.175,51.825
P1V0: C91.1 C92.2 C93.2 C94.2 C95.2 C96.2 C102.2 C103.2 C104.2 C105.2 C106.2 C107.2 C108.2 C109.2 C110.2 C260.2 IC4.H8 IC4.H10 IC4.J7 IC4.J9 IC4.K8 IC4.L7 IC4.M8 IC4.N7 IC4.P8 IC4.P10 IC4.R7 IC4.R9 IC4.T8 IC4.T10 L13.1 L15.1 L42.2 R131.1 R155.2 R182.2 TP13.1 | length 235.9
  TopLayer w0.25: v2(108.675,46.325) IC4.H8@109.175,46.825 ; v2(108.675,48.325) IC4.H10@109.175,48.825 ; v2(109.675,45.325) IC4.J7@110.175,45.825 ; v2(109.675,47.325) IC4.J9@110.175,47.825 ; v2(110.675,46.325) IC4.K8@111.175,46.825 ; v2(111.675,45.325) IC4.L7@112.175,45.825 ; IC4.M8@113.175,46.825 v2(113.675,46.325) ; IC4.N7@114.175,45.825 v2(114.675,45.325) ; IC4.P8@115.175,46.825 v2(115.675,46.325) ; IC4.P10@115.175,48.825 v2(115.675,48.325) ; IC4.R7@116.175,45.825 v2(116.675,45.325) ; IC4.R9@116.175,47.825 v2(116.675,47.325) ; IC4.T8@117.175,46.825 v2(117.675,46.325) ; IC4.T10@117.175,48.825 v2(117.675,48.325) ; R131.1@123.486,20.458 123.532,20.504 v1(124.225,20.504) ; 124.192,24.988 124.794,24.988 L42.2@125.279,24.988 ; 124.192,26.488 L42.2@125.604,26.488 ; L42.2@124.938,24.646 L42.2@125.279,24.988 ; L42.2@125.6,26.5 125.6,27.75 125.825,27.975 126.275,27.975 126.875,28.575 C260.2@126.875,30.243 126.875,30.596 126.425,31.046 126.071,31.046 125.585,31.533 125.585,38.438 126.125,38.978 126.125,44.419 127.8,46.094 127.8,47.225 128.85,48.275 C91.1@128.9,48.275 ; 127.017,24.988 L42.2@125.279,24.988 ; 127.017,26.488 L42.2@125.604,26.488 ; R155.2@132.025,7.15 v1(132.025,7.95) ; v1(138.483,77.37) 137.062,77.37 136.217,78.215 136.217,83.203 137.846,84.832 137.846,91.037 135.281,93.602 135.281,95.225 135.878,95.822 v1(147.713,95.822) TP13.1@149.023,95.822 ; L42.2@125.279,24.988 125.604,25.313 L42.2@125.604,25.738 L42.2@125.604,26.488
  TopLayer w0.3: L42.2@124.794,25.64 124.794,24.988 124.794,24.791 124.844,24.74 v1(124.844,23.79) ; v2(125.601,49.09) v2(126.071,49.09) v2(126.071,49.561) v2(126.542,50.032) 127.151,50.64 127.74,50.64 C94.2@127.95,50.85 ; v2(126.166,53.021) 126.589,52.597 127.928,52.597 C93.2@127.975,52.55 ; L13.1@128.168,54.286 127.975,54.093 C93.2@127.975,52.55 ; C91.1@128.9,48.275 127.95,49.225 C94.2@127.95,50.85 ; C94.2@127.95,50.85 127.95,52.525 C93.2@127.975,52.55
  MidLayer2 w0.125: v1(98.205,45.224) 99.93,45.224 100.6,44.555 ; 100.956,44.199 101.301,43.854 107.909,43.854 108.155,44.1 108.155,45.805 v2(108.675,46.325) ; v2(108.675,48.325) v2(109.675,47.325) v2(110.675,46.325) ; v2(109.675,45.325) v2(110.675,46.325) ; v2(111.675,45.325) v2(110.675,46.325) ; v2(114.675,45.325) v2(113.675,46.325) 113.165,46.835 ; v2(115.675,48.325) v2(116.675,47.325) ; v2(117.675,48.325) v2(116.675,47.325) ; v2(125.601,49.09) 125.601,47.267 124.242,45.909 124.242,45.344 123.661,44.762 118.603,44.762 118.18,45.186 118.18,45.82 v2(117.675,46.325) ; v2(110.675,46.325) 111.185,46.835 113.165,46.835 ; 113.165,46.835 115.165,46.835 v2(115.675,46.325) v2(116.675,45.325) v2(117.675,46.325) ; v2(116.675,47.325) v2(117.675,46.325)
  MidLayer2 w0.25: 100.956,44.199 100.6,44.555 100.6,43.515 100.71,43.405 100.71,42.97 100.408,42.668 100.408,41.894 100.71,41.592 100.71,39.61 102.802,37.519 102.802,30.507 103.925,29.384 103.925,27.369 105.196,26.097 105.196,21.918 106.139,20.975 106.326,20.975 107.001,20.3 v1(109.237,20.3) ; v2(126.166,53.021) 127.123,53.021 ; v2(126.542,49.561) 126.569,49.561 126.665,49.656 130.945,49.656 132.997,51.708 132.997,53.751 133.805,54.559 134.951,54.559 135.631,55.24 135.631,56.333 137.954,58.656
  BottomLayer w0.125: v2(108.675,46.325) 108.675,46.175 C107.2@109.175,45.675 v2@109.525,45.325 ; C108.2@109.025,47.825 109.525,47.325 v2(109.675,47.325) ; C104.2@111.175,45.675 111.525,45.325 v2(111.675,45.325) ; v2(113.675,46.325) 113.675,46.175 C103.2@114.175,45.675 v2@114.525,45.325 ; C106.2@115.325,47.825 115.414,47.825 115.649,48.06 115.649,48.299 v2(115.675,48.325) ; C95.2@116.175,45.675 116.525,45.325 v2(116.675,45.325) ; v2(116.675,47.325) 116.825,47.325 C105.2@117.325,46.825 117.675,46.475 v2(117.675,46.325) ; C102.2@117.325,48.825 117.35,48.825 117.632,48.543 117.632,48.368 v2(117.675,48.325)
  BottomLayer w0.25: v1(98.205,45.224) 98.888,45.224 L15.1@98.989,45.325 ; v1(109.237,20.3) 110.475,20.3 112.194,18.581 113.025,18.581 114.06,17.546 116.188,17.546 117.123,16.612 118.26,16.612 119.257,17.608 119.257,17.717 119.848,18.308 120.351,18.308 121.299,19.256 122.951,19.256 124.199,20.504 v1(124.225,20.504) ; v1@124.84,23.803 124.84,22.036 127.093,19.784 127.093,14.843 127.665,14.271 127.665,12.31 v1(132.025,7.95) ; v1(147.713,95.822) R182.2@148.895,95.822
  BottomLayer w0.3: C109.2@122.525,48.6 122.525,50.048 C96.2@122.55,50.073 ; C92.2@127.95,49.825 127.975,49.85 C110.2@127.975,51.5
  other v2: 126.504,53.491
P1V2: C338.2 IC28.1 L18.1 R183.2 TP14.1 | length 185.6
  TopLayer w0.1: v1(148.015,93.599) 148.997,93.599 TP14.1@149.023,93.625 ; v1(157.648,11.275) 158.975,12.601 158.975,75.272 157.867,76.38 157.867,90.151 v1(158.521,90.805)
  TopLayer w0.25: v1(99.55,38.388) L18.1@99.55,39.213 ; v1(100.185,38.388) L18.1@100.185,39.213 ; IC28.1@105.013,17.203 C338.2@106.283,17.203 ; v1(106.283,18.028) C338.2@106.283,17.203 ; C338.2@106.603,17.201 106.601,17.203 C338.2@106.283,17.203 ; C338.2@106.919,17.203 v1(106.919,18.028)
  SignalLayer1 w0.25: 100.194,39.25 100.194,33.942 104.377,29.76 104.377,23.179 106.283,21.272 v1(106.283,18.028)
  BottomLayer w0.1: v1(148.015,93.599) R183.2@148.996,93.599 148.996,93.549 149.396,93.149 149.446,93.149 149.936,92.659 152.82,92.659 155.03,90.45 157.97,90.45 158.012,90.491 158.208,90.491 v1(158.521,90.805)
  BottomLayer w0.25: v1(106.919,18.028) 112.862,18.028 113.578,17.312 113.578,16.625 115.677,14.526 125.82,14.526 127.1,13.246 127.1,11.664 131.339,7.425 132.242,7.425 132.294,7.476 132.494,7.476 135.307,10.29 138.472,10.29 139.731,11.549 140.454,11.549 143.748,14.843 145.806,14.843 146.66,15.697 149.428,15.697 151.3,13.825 157.502,13.825 157.648,13.679 v1(157.648,11.275)
P1V2A: C269.2 C291.2 C292.2 C293.2 C294.2 C295.2 C296.2 C297.2 C298.2 C299.2 C300.2 C301.1 C302.2 C303.2 IC19.1 IC19.18 IC19.19 IC19.20 L11.2 R180.2 R205.2 TP1.1 U1.D9 U1.E9 U1.E10 U1.F10 U1.G10 U1.H10 U1.J10 U1.K9 U1.K10 U1.L9 | length 183.5
  TopLayer w0.2: v2(87.693,51.525) U1.E10@88.093,51.925 ; v2(87.693,52.325) U1.F10@88.093,52.725 ; v2(87.693,53.125) U1.G10@88.093,53.525 ; v2(87.693,54.725) U1.H10@88.093,54.325 ; v2(87.693,55.525) U1.J10@88.093,55.125 ; v2(87.693,56.325) U1.K10@88.093,55.925 ; v2(88.493,50.725) U1.D9@88.893,51.125 ; v2(88.493,51.525) U1.E9@88.893,51.925 ; v2(88.493,56.325) U1.K9@88.893,55.925 ; v2(88.493,57.125) U1.L9@88.893,56.725
  TopLayer w0.25: v1(85.813,41.544) 85.813,42.824 L11.2@85.815,42.825 ; IC19.1@88.879,30.247 88.879,32.272 89.504,32.897 C269.2@89.504,33.722 89.929,33.297 C269.2@89.929,32.897 ; IC19.20@89.929,31.297 C269.2@89.929,32.897 ; C302.2@90.272,65.591 90.597,65.266 C303.2@90.597,64.491 ; IC19.19@90.579,31.297 90.579,32.447 R180.2@91.029,32.897 ; IC19.18@91.229,31.297 91.229,32.697 R180.2@91.029,32.897 ; C301.1@92.688,62.983 C291.2@90.547,62.983 C297.2@90.547,63.708 ; C301.1@92.739,64.491 C303.2@90.597,64.491 ; 95.072,63.466 94.925,63.613 92.9,63.613 C301.1@92.747,63.766 92.688,63.708 C297.2@90.547,63.708 ; v1(95.072,65.891) 95.072,65.066 v1(95.897,65.066) ; v1(136.322,93.668) 137.218,93.668 140.081,90.805 143.829,90.805 143.94,90.916 v1(147.756,90.916) 148.574,90.916 TP1.1@149.073,91.415 ; C269.2@89.929,32.897 R180.2@91.029,32.897 ; C297.2@90.547,63.708 90.547,64.441 C303.2@90.597,64.491
  MidLayer2 w0.125: v2(88.493,50.725) v2(88.493,51.525) v2(87.693,51.525) v2(87.693,52.325) v2(87.693,53.125) v2(87.693,54.725) v2(87.693,55.525) v2(87.693,56.325) v2(88.493,56.325) v2(88.493,57.125) 88.88,57.512 88.88,60.194 89.232,60.545 90.305,60.545 v1@91.997,62.236
  MidLayer2 w0.2: v1(92.412,34.361) 93.663,34.361 93.954,34.07
  MidLayer2 w0.25: v1(85.813,41.544) 90.902,36.455 v1(90.902,35.495) ; v1(92.402,35.495) 93.255,35.495 97.616,39.856 97.616,42.779 97.425,42.97 97.425,43.405 97.539,43.52 97.539,43.727 97.434,43.833 97.434,60.429 95.897,61.966 v1(95.897,65.066)
  BottomLayer w0.075: C300.2@88.9,49.22 89.182,49.22 89.601,48.801 89.601,48.62 C299.2@89.764,48.458
  BottomLayer w0.125: v2(87.693,52.325) 88.093,52.725 88.641,52.725 88.966,53.05 88.966,53.27 C295.2@89.321,53.625 ; v2(87.693,53.125) 87.693,53.446 C292.2@87.896,53.65 ; v2(87.693,54.725) 87.693,54.429 C298.2@87.896,54.225 ; v2(87.693,55.525) 88.08,55.137 88.628,55.137 88.905,54.861 88.905,54.695 88.973,54.628 88.973,54.497 89.072,54.397 89.159,54.397 89.321,54.235 C296.2@89.321,54.225 ; v2(88.493,50.725) 88.88,50.337 88.88,49.382 88.893,49.37 C300.2@89.012,49.37 ; v2(88.493,51.525) 88.905,51.112 89.455,51.112 C294.2@89.818,50.75 ; v2(88.493,57.125) 88.905,56.712 89.555,56.712 C293.2@89.818,56.975
  BottomLayer w0.25: v1(95.072,65.891) 99.807,65.891 101.757,67.842 101.757,73.772 99.319,76.21 99.319,84.902 100.639,86.221 124.589,86.221 127.135,88.767 128.569,88.767 130.252,90.45 133.342,90.45 136.441,93.549 v1(136.322,93.668) ; v1(147.756,90.916) 148.04,90.916 148.946,91.822 R205.2@148.946,91.872
  other v1: 90.912,34.361 91.662,34.361 91.652,35.495 85.817,40.87 91.247,62.419 91.997,62.419 92.747,62.419 93.497,62.419 94.247,62.419
P1V2D: C191.2 C310.2 C311.2 C312.2 C313.2 C314.2 C315.2 C316.2 C317.2 C318.2 C319.1 C320.2 C321.2 IC36.1 IC36.18 IC36.19 IC36.20 R255.2 U1.D7 U1.E5 U1.E6 U1.E7 U1.F5 U1.J5 U1.K5 U1.K6 U1.K7 U1.L7 | length 64.5
  TopLayer w0.2: U1.D7@90.493,51.125 v2(90.893,50.725) ; U1.E7@90.493,51.925 v2(90.893,51.525) ; U1.K7@90.493,55.925 v2(90.893,56.325) ; U1.L7@90.493,56.725 v2(90.893,57.125) ; U1.E6@91.293,51.925 v2(91.693,51.525) ; U1.K6@91.293,55.925 v2(91.693,56.325) ; U1.E5@92.093,51.925 v2(92.493,51.525) ; U1.F5@92.093,52.725 v2(92.493,52.325) ; U1.J5@92.093,55.125 v2(92.493,55.525) ; U1.K5@92.093,55.925 v2(92.493,56.325)
  TopLayer w0.25: C319.1@92.345,42.43 v1(92.345,43.78) ; C319.1@93.07,42.43 C319.1@93.095,42.455 ; v1(93.095,43.78) C319.1@93.095,42.455 ; C319.1@93.712,41.705 94.995,41.705 95.27,41.43 95.445,41.255 C320.2@95.495,41.255 95.295,41.455 C321.2@95.295,42.455 ; v1(93.845,43.78) 93.845,43.205 C319.1@93.845,42.455 ; C319.1@93.851,43.205 95.074,43.205 95.245,43.205 C313.2@95.32,43.28 95.32,42.48 C321.2@95.295,42.455 ; 96.745,39.655 96.745,38.003 99.05,35.699 C191.2@99.05,33.742 ; IC36.20@97.55,31.289 97.55,32.61 97.775,32.835 97.775,32.882 97.921,33.028 98.2,33.028 ; IC36.19@98.2,31.289 98.2,33.028 ; IC36.18@98.85,31.289 C191.2@98.85,33.327 ; R255.2@102.85,32.758 101.68,32.758 100.696,33.742 C191.2@99.05,33.742 ; C319.1@93.095,42.455 C319.1@93.845,42.455 ; C319.1@93.845,42.455 C321.2@95.295,42.455 ; 98.2,33.028 98.551,33.028 C191.2@98.85,33.327 ; C191.2@98.85,33.327 99.05,33.527 C191.2@99.05,33.742
  TopLayer w0.3: IC36.1@96.5,30.239 96.5,30.95 96.839,31.289 IC36.20@97.55,31.289
  MidLayer2 w0.125: v2(90.893,57.125) v2(90.893,56.325) ; v1(92.345,43.78) 90.325,45.8 90.325,50.157 v2(90.893,50.725) v2(90.893,51.525) ; v2(92.493,52.325) v2(92.493,51.525) v2(91.693,51.525) v2(90.893,51.525) ; v2(92.493,55.525) v2(92.493,56.325) v2(91.693,56.325) v2(90.893,56.325) ; v2(90.893,51.525) 90.325,52.093 90.325,55.757 v2(90.893,56.325)
  BottomLayer w0.125: C315.2@89.818,52.175 90.346,52.175 90.346,52.162 90.388,52.162 90.85,51.7 90.85,51.568 v2(90.893,51.525) ; C314.2@89.818,55.6 90.346,55.6 90.346,55.625 90.4,55.625 90.823,56.048 90.823,56.195 90.893,56.264 v2(90.893,56.325) ; C317.2@90.343,50.75 90.868,50.75 v2(90.893,50.725) ; C312.2@90.346,56.975 90.496,57.125 v2(90.893,57.125) ; v2(92.493,52.325) 92.905,52.737 92.905,53.637 C316.2@92.943,53.675 ; v2(92.493,55.525) 92.905,55.112 92.905,54.263 C310.2@92.943,54.225
P1V5: C60.2 C65.2 C87.2 C90.2 C164.2 C165.2 C166.2 C167.2 C168.2 C169.2 C170.2 C171.2 C176.2 C213.2 C214.2 C215.2 C240.2 C264.2 C337.2 IC4.C1 IC4.F2 IC4.H6 IC4.J3 IC4.M4 IC4.N1 IC8.A1 IC8.A8 IC8.B2 IC8.C1 IC8.C9 IC8.D2 IC8.D9 IC8.E9 IC8.F1 IC8.G7 IC8.H2 IC8.H9 IC8.K2 IC8.K8 IC8.N1 IC8.N9 IC8.R1 IC8.R9 IC9.2 IC28.6 L43.2 L46.1 R128.1 R133.2 R173.1 R208.2 TP3.1 | length 231.5
  TopLayer w0.125: v2(106.675,40.325) IC4.F2@107.175,40.825 ; v2(109.675,41.325) IC4.J3@110.175,41.825 ; IC4.M4@113.175,42.825 v2(113.675,42.325)
  TopLayer w0.2: 96.25,19.635 96.375,19.51 98.025,19.51 ; IC8.A1@108.041,21.72 108.199,21.562 v2(108.199,21.262) ; IC8.A8@108.041,27.32 v2(108.365,26.996) ; v2(108.499,22.178) IC8.B2@108.841,22.52 ; v2(109.641,21.27) IC8.C1@109.641,21.72 ; IC8.C9@109.641,28.12 109.641,28.135 110.004,28.498 v2(110.004,28.513) 110.026,28.513 110.397,28.142 IC8.D9@110.397,28.12 ; v2(110.152,22.866) 110.441,22.576 IC8.D2@110.441,22.52 ; IC8.E9@111.215,28.217 111.215,28.62 111.251,28.656 111.251,28.809 v2(111.279,28.838) ; v2(112.041,21.204) IC8.F1@112.041,21.72 ; v2(112.321,26.058) 112.35,26.058 112.812,26.52 IC8.G7@112.841,26.52 ; v2@113.315,22.194 IC8.H2@113.641,22.52 ; IC8.H9@113.641,28.12 113.649,28.12 114.057,28.528 v2(114.065,28.528) ; IC4.N1@114.175,39.825 114.213,39.787 114.213,39.246 114.67,38.789 114.67,38.417 v2(114.679,38.407) ; C169.2@114.365,19.378 v2(114.365,19.878) 114.365,20.928 114.84,21.403 114.84,22.119 IC8.K2@115.241,22.52 115.49,22.769 v2(115.49,22.826) ; v2@114.93,27.631 IC8.K8@115.241,27.32 ; v2(117.38,21.362) 117.389,21.372 117.389,21.441 117.641,21.693 IC8.N1@117.641,21.72 ; IC8.N9@117.641,28.12 v2(117.641,29.154) ; IC8.R1@119.24,21.719 C171.2@119.24,19.853 119.615,19.853 v1(119.915,19.553) ; IC8.R1@119.241,21.72 119.645,22.124 v2(119.695,22.124) ; IC8.R9@119.241,28.12 119.305,28.184 v2(119.305,28.838) v2@119.305,28.863
  TopLayer w0.25: 82.454,25.309 82.454,28.134 ; 83.954,25.309 83.954,28.134 ; 86.675,16.062 86.675,18.887 ; 88.175,16.062 L43.2@88.175,17.475 ; v1(94.877,25.96) R173.1@94.877,26.579 ; C337.2@104.803,13.328 104.803,12.337 105.103,12.037 107.541,12.037 108.421,12.917 R128.1@109.178,12.917 110.748,12.917 C176.2@110.853,12.812 ; v2(108.675,44.325) IC4.H6@109.175,44.825 ; C176.2@110.853,12.487 111.128,12.762 IC9.2@111.128,14.612 ; v1(148.134,89.967) 148.181,89.919 148.353,89.919 TP3.1@149.047,89.224
  TopLayer w0.3: IC4.C1@104.175,39.825 104.175,39.043 v7(104.915,38.303) ; C337.2@105.013,13.538 IC28.6@105.013,15.12 ; v2@114.93,27.631 v2(114.93,27.663)
  TopLayer w0.4: L43.2@87.425,17.475 88.045,18.095 R133.2@90.875,18.095 92.17,18.095 93.71,19.635 96.25,19.635 96.25,17.975 96.85,17.375 98.925,17.375 100.15,16.15 100.15,15.085 101.907,13.328 C337.2@104.803,13.328 C337.2@105.013,13.538
  MidLayer2 w0.25: v1(94.877,25.96) v1(94.877,18.841) v1@94.898,18.82
  BottomLayer w0.1: v2(119.305,28.838) 120.201,27.941 122.419,27.941 128.275,22.086 128.275,18.955 128.48,18.75 128.48,18.309 131.091,15.697 138.283,15.697 139.046,16.46 150.279,16.46 152.613,14.125 158.728,14.125 159.446,14.843 159.446,85.058 157.171,87.334 157.171,87.499 156.943,87.727 156.777,87.727 156.3,88.204 152.407,88.204 152.245,88.367 150.144,88.367 149.955,88.555 149.827,88.555 149.637,88.746 149.637,88.874 149.345,89.166 149.345,89.567 148.945,89.967 R208.2@148.895,89.967
  BottomLayer w0.125: C90.2@106.175,40.975 106.675,40.475 v2(106.675,40.325) ; C214.2@108.175,44.675 108.525,44.325 v2(108.675,44.325) ; C65.2@109.175,40.675 109.675,41.175 v2(109.675,41.325) ; C60.2@112.525,43.025 112.575,43.025 112.988,43.438 112.988,43.488 113.325,43.825 113.758,43.825 114.108,43.475 114.108,42.758 v2(113.675,42.325) ; v2@113.825,42.325 C215.2@114.325,41.825
  BottomLayer w0.2: v2(108.199,21.262) 107.958,21.504 107.958,21.9 C166.2@107.947,21.911 108.036,22.001 108.307,22.001 108.484,22.178 v2(108.499,22.178) ; v2(108.365,26.996) 108.394,27.025 108.394,27.207 108.715,27.528 108.892,27.528 108.992,27.628 108.992,27.678 109.092,27.778 109.194,27.778 109.9,28.484 109.976,28.484 v2(110.004,28.513) ; v2(109.641,21.27) 109.89,21.519 109.89,21.624 109.99,21.724 C170.2@110.015,21.724 110.015,22.688 110.152,22.826 v2(110.152,22.866) ; v2@110.043,28.488 C165.2@110.647,28.488 ; C165.2@110.647,28.396 110.647,28.421 110.747,28.521 110.949,28.521 v2@111.273,28.845 ; v2(114.065,28.528) 114.09,28.553 114.715,28.553 C164.2@114.74,28.578 114.74,27.893 114.93,27.703 v2(114.93,27.663) ; v2(114.165,38.578) 114.487,38.578 v2@114.658,38.407 ; C240.2@115.116,39.527 114.885,39.296 114.885,38.613 v2(114.679,38.407) v2@114.658,38.407 ; C213.2@115.79,37.403 115.615,37.403 115.19,37.828 115.19,37.875 v2@114.658,38.407 ; v2@119.29,28.853 C168.2@119.29,29.328
  BottomLayer w0.25: v1(148.134,89.967) R208.2@148.895,89.967
  BottomLayer w0.3: v7(104.915,38.303) 104.915,38.228 105.315,37.828 105.315,37.653 105.69,37.278 C87.2@105.865,37.278
  other v2: 113.31,22.194
P1V5A: C28.2 C69.1 C265.1 C349.2 C350.1 IC19.5 IC19.6 IC19.7 IC19.8 IC36.5 IC36.6 IC36.7 IC36.8 L46.2 | length 44.4
  TopLayer w0.152: L46.2@83.204,30.922 83.604,30.922 83.954,30.572 84.829,29.697 C265.1@86.654,29.697 ; 86.654,27.854 86.861,27.647 IC19.5@88.879,27.647
  TopLayer w0.25: 82.454,29.509 82.454,32.334 ; 83.954,29.509 83.954,30.572 83.954,32.334 ; C265.1@86.654,29.697 86.654,27.854 86.861,27.647 89.183,25.326 89.183,24.643 C350.1@89.854,23.972 ; IC19.6@89.929,26.597 C350.1@89.929,24.047 ; IC19.7@90.579,26.597 90.579,25.747 ; IC19.8@91.229,26.597 91.229,25.822 91.205,25.798 90.63,25.798 90.579,25.747 ; IC36.5@96.5,27.639 96.5,25.588 96.05,25.138 C69.1@96.05,24.379 ; IC36.6@97.55,26.589 97.55,25.622 97.696,25.475 97.825,25.475 C28.2@98.2,25.1 ; IC36.7@98.2,26.589 C28.2@98.2,25.1 ; IC36.8@98.85,26.589 98.85,25.7 C28.2@98.225,25.075 ; C350.1@89.854,23.972 89.854,23.75 90.629,22.975 C349.2@92,22.975 93.457,22.975 94.861,24.379 C69.1@96.05,24.379 ; C350.1@89.854,23.972 C350.1@89.929,24.047 ; C350.1@89.929,24.047 90.579,24.697 90.579,25.747 ; C69.1@96.05,24.379 97.825,24.379 98.225,24.779 C28.2@98.225,24.9 C28.2@98.225,25.075 ; C28.2@98.2,25.1 C28.2@98.225,25.075